# Altium PCB PCB1.PcbDoc (part 3 of 3)
Units mm, origin at the board's own origin, x right, y up, seen from the top; angles counter-clockwise.
Board outline 161.54 x 169.48 mm, 4 copper layers (Top Layer, Layer 1, Layer 2, Bottom Layer), stack 0.603 mm thick; 181 components, 244 nets, 1695 pads, 188 vias.
Unrouted connection lines stored in the file: 630.
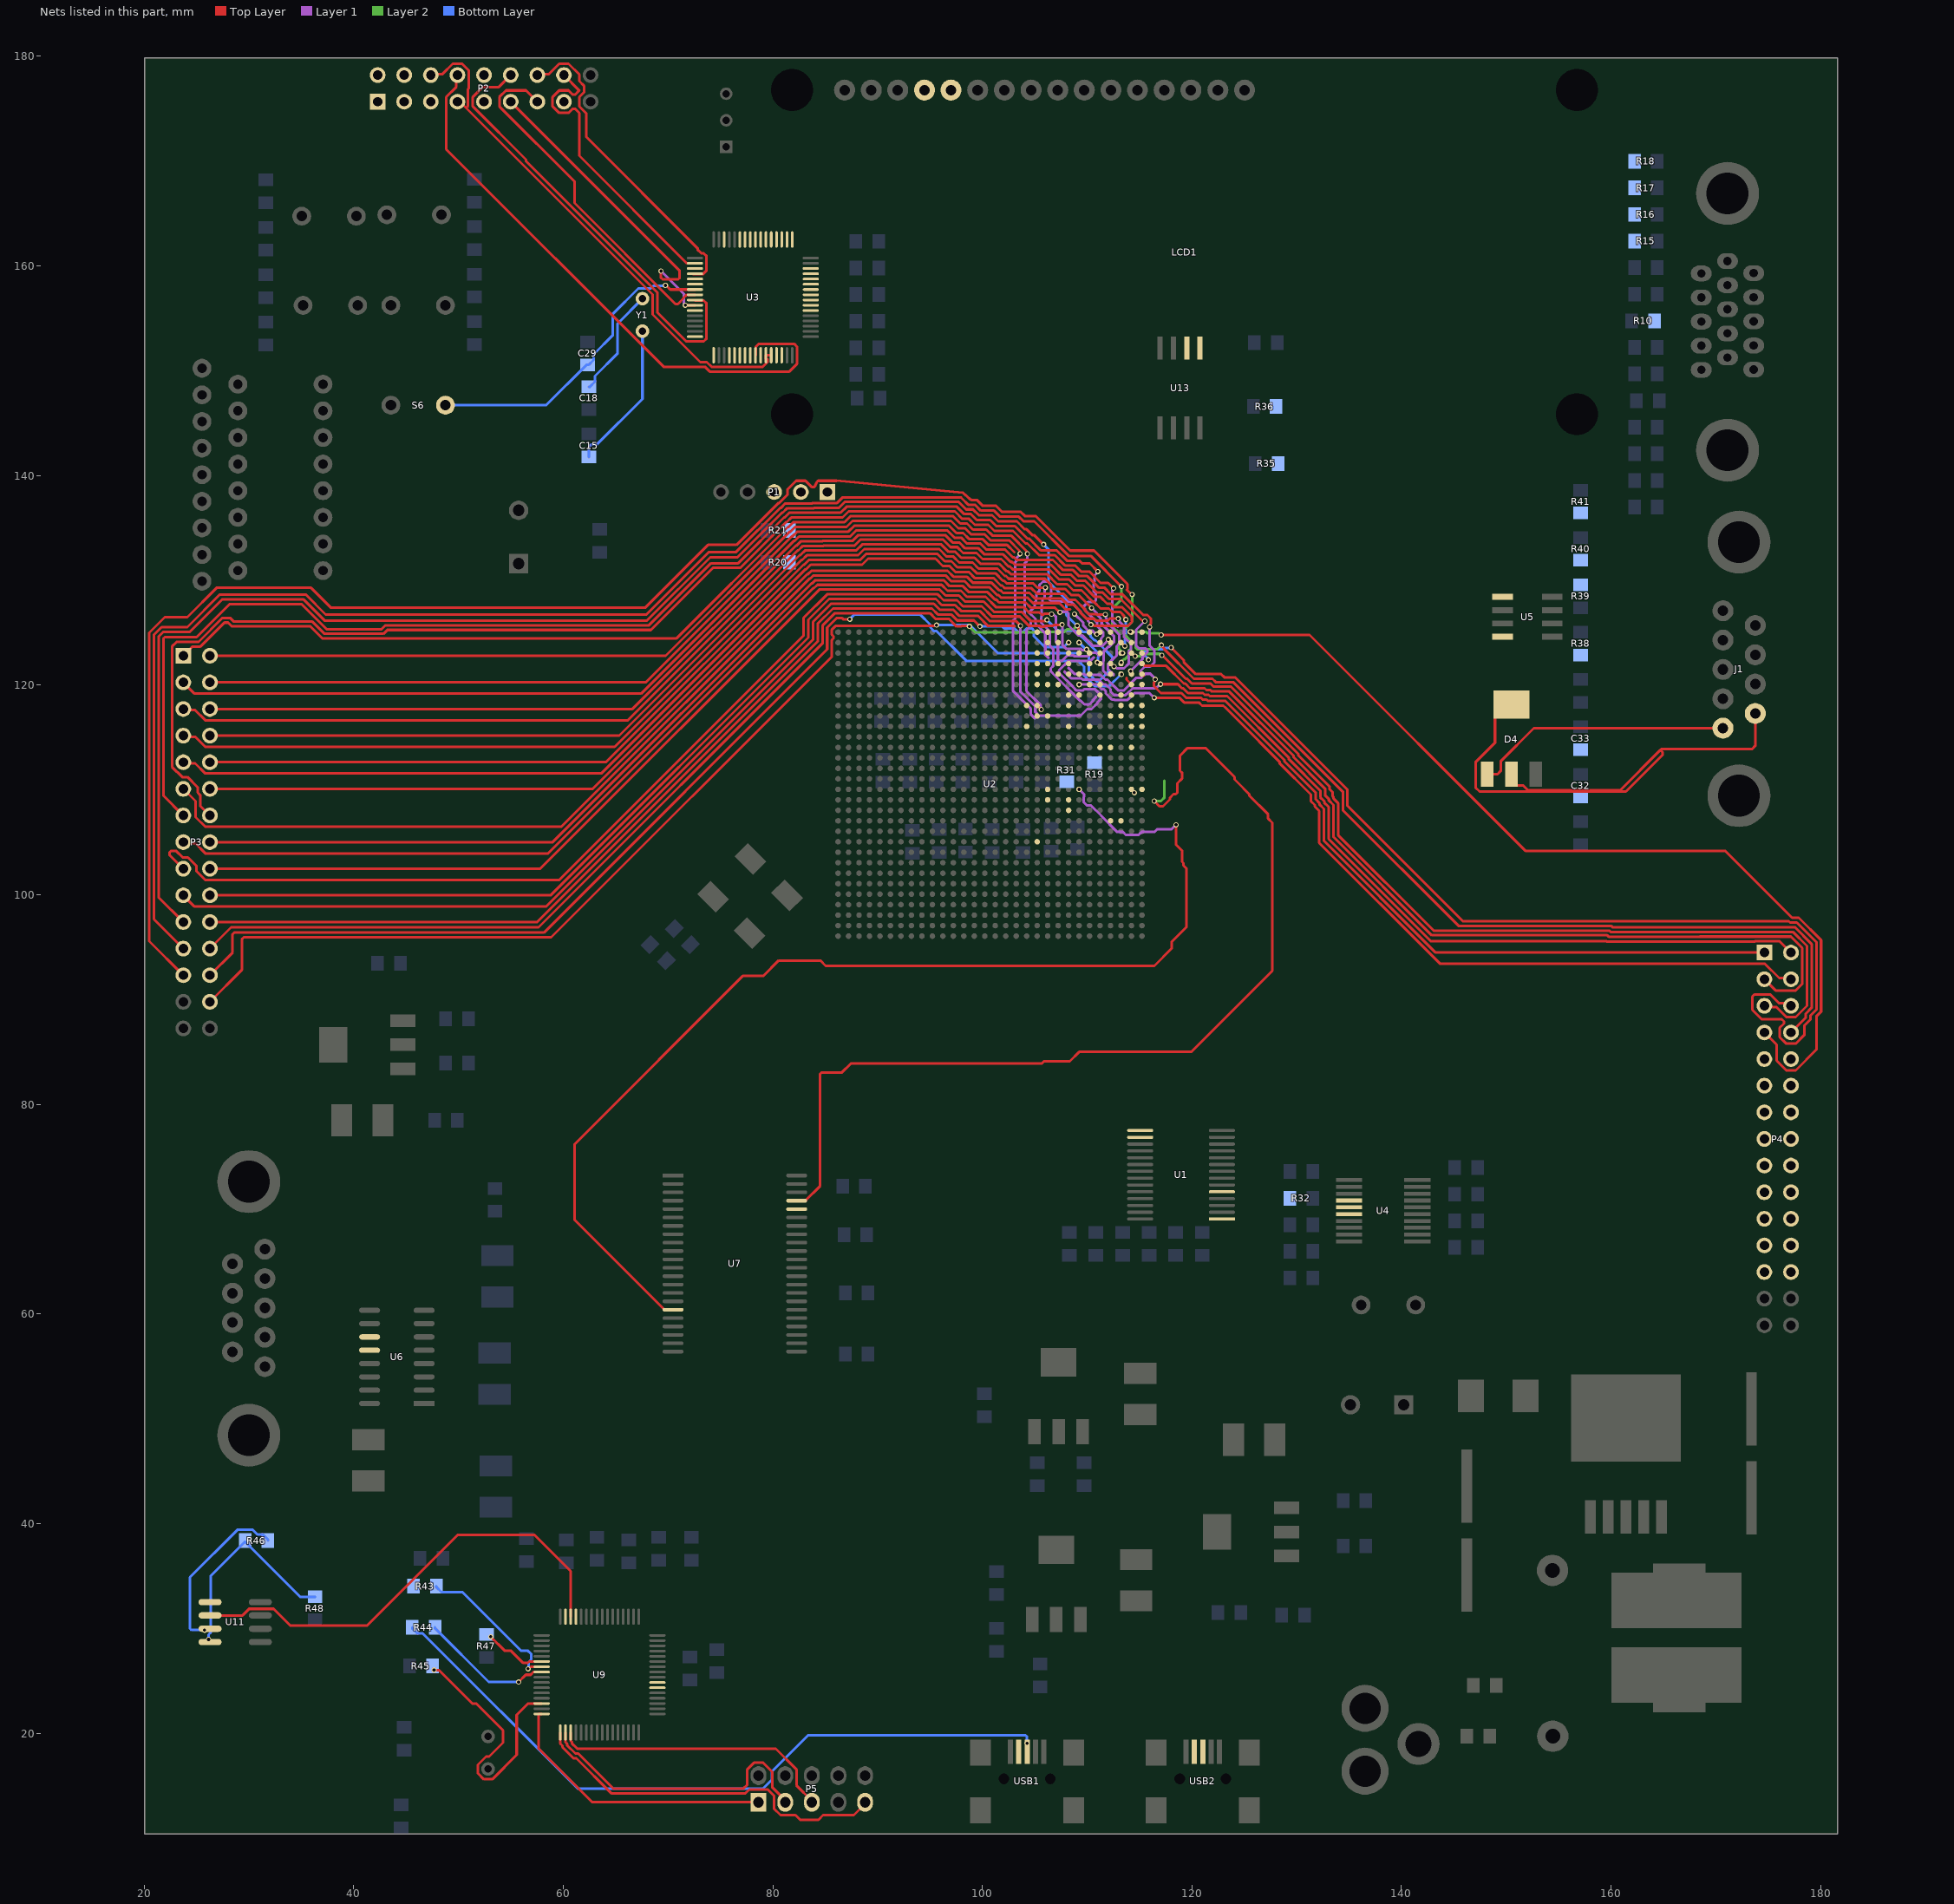
[diagram p5: the nets of this part, all layers, seen from the top]

## Via types
v1: diameter 0.5, hole 0.3, Top Layer to Bottom Layer, 94 vias
v2: diameter 0.5, hole 0.3, Top Layer to Layer 2, 55 vias
v3: diameter 0.5, hole 0.3, Top Layer to Layer 1, 39 vias

## Nets (pads, with @x,y where several pads share a name; then routed paths per layer and width w, separated by ;. In a path a pad name is that pad's centre, name@x,y a point inside that pad or via, vN(x,y) a via of type N, cw(c..) or ccw(c..) an arc to the next point about the centre after c; other vN are vias at no path point) (continued)
NetR43_1: R43.1 U9.7 | length 14.7
  Top Layer w0.25: v1(56.655,26.156) 56.723,26.156 56.913,26.346 U9.7@57.947,26.346
  Bottom Layer w0.25: R43.1@47.904,34.041 47.904,33.941 48.379,33.466 50.391,33.466 55.96,27.897 56.609,27.897 56.963,27.543 56.963,27.037 56.703,26.777 56.703,26.204 v1(56.655,26.156)
NetR43_2: R43.2 USB1.2
NetR44_1: R44.1 U9.8 | length 12.8
  Top Layer w0.25: v1(55.753,24.892) 56.442,25.581 56.893,25.581 57.158,25.846 U9.8@57.947,25.846
  Bottom Layer w0.25: R44.1@47.777,30.104 47.777,30.004 52.889,24.892 v1(55.753,24.892)
NetR44_2: R44.2 USB1.3 | length 68.3
  Bottom Layer w0.25: R44.2@45.593,30.104 45.593,30.004 46.068,29.529 46.593,29.529 61.389,14.733 79.091,14.733 79.916,15.557 79.916,16.358 83.37,19.812 104.121,19.812 104.267,19.666 v1(104.267,19.05)
NetR45_1: R45.1 U9.14 | length 25.8
  Top Layer w0.25: v1(47.683,26.035) 48.133,26.035 51.322,22.846 51.691,22.846 54.257,20.28 54.257,19.099 52.94,17.783 52.646,17.783 51.857,16.994 51.857,16.186 52.428,15.615 53.236,15.615 55.565,17.944 55.565,21.75 56.661,22.846 U9.14@57.947,22.846
NetR46_1: R46.1 U9.61 U11.3 | length 16.2
  Bottom Layer w0.25: v1(25.781,29.845) 24.53,29.845 24.384,29.991 24.384,34.886 28.907,39.409 30.376,39.409 30.826,38.959 31.351,38.959 31.826,38.484 R46.1@31.826,38.384
NetR46_2: R46.2 R48.1 U11.4 | length 19.6
  Bottom Layer w0.25: v1(26.162,28.956) 26.162,29.413 26.356,29.607 26.356,34.998 29.642,38.284 34.901,33.025 R48.1@36.322,33.025
NetR47_1: R47.1 U9.6 | length 5.9
  Top Layer w0.25: v1(53.086,29.21) 54.4,27.896 54.984,27.896 56.15,26.73 56.626,26.73 56.742,26.846 U9.6@57.947,26.846
NetU1_15: U1.15 USB2.3
NetU1_16: U1.16 USB2.2
NetU9_62: U9.62 U11.2 | length 44.7
  Top Layer w0.25: U11.2@26.302,31.247 29.4,31.247 30.025,31.872 32.373,31.872 33.958,30.286 41.288,30.286 49.931,38.929 57.261,38.929 60.722,35.468 U9.62@60.722,31.121
NetU9_63: U9.63 U11.1
NRST: C29.2 P1.3 R31.2 S6.2 U3.7 | length 30.2
  Top Layer w0.25: v1(69.759,158.146) 69.827,158.146 70.219,157.754 U3.7@72.58,157.754
  Bottom Layer w0.25: S6.2@48.768,146.717 58.387,146.717 62.232,150.562 C29.2@62.332,150.562 62.432,150.562 62.907,151.037 62.907,151.562 64.748,153.403 64.748,155.44 67.169,157.861 68.371,157.861 68.61,158.1 69.713,158.1 v1(69.759,158.146)
OE: U2.AJ15 U7.41 | length 97.3
  Top Layer w0.25: U7.41@82.285,70.814 83.11,70.814 84.524,72.228 84.524,82.912 84.67,83.058 86.607,83.058 87.46,83.911 105.689,83.911 105.885,84.107 108.341,84.107 109.241,85.007 119.932,85.007 127.671,92.746 127.671,106.88 127.274,107.277 127.274,107.674 125.469,109.478 125.469,109.603 124.311,110.76 124.311,110.763 124.068,111.006 124.068,111.233 121.299,114.002 119.593,114.002 118.865,113.274 118.865,111.837 119.047,111.655 119.047,111.084 118.607,110.644 118.607,109.747 118.461,109.601 118.244,109.601 117.925,109.282 117.925,109.222 117.907,109.204 117.907,109.111 117.247,108.451 116.898,108.451 v2(116.408,108.941) ; U2.AJ15@114.233,110.062 114.233,110.033 114.501,109.765 v2(114.501,109.736)
  Layer 2 w0.25: v2(116.408,108.941) 117.038,108.941 117.384,109.288 117.384,110.846 117.348,110.882
OSC_IN: C15.2 U3.5 Y1.2 | length 14.4
  Bottom Layer w0.25: C15.2@62.459,141.78 62.459,142.723 62.712,142.976 63.23,142.976 67.564,147.31 Y1.2@67.564,153.777
OSC_OUT: C18.1 U3.6 Y1.1 | length 10.6
  Bottom Layer w0.25: C18.1@62.459,148.482 62.559,148.482 63.034,148.957 63.034,149.504 65.198,151.669 65.198,154.511 Y1.1@67.564,156.877
P1: P2.1 U3.45
P2: P2.5 P2.6 P2.7 R19.1 U3.26 U3.27 U3.28 | length 50.7
  Top Layer w0.25: P2.6@47.371,178.213 47.476,178.318 48.496,178.318 49.466,179.288 50.356,179.288 50.986,178.658 50.986,176.926 50.926,176.866 50.926,175.259 50.743,175.076 ; P2.7@49.911,175.673 50.147,175.673 50.743,175.076 ; U3.28@79.855,151.479 U3.27@79.355,151.479 79.355,151.13 79.502,151.13 79.502,150.839 79.041,150.379 74.169,150.379 73.719,150.829 73.082,150.829 68.539,155.372 68.539,157.281 50.743,175.076
P5: P2.4 U3.29
P6: P2.3 U3.30
P7: P2.13 U3.8 | length 33.3
  Top Layer w0.25: P2.13@57.531,175.673 56.456,176.748 54.546,176.748 53.916,176.118 53.916,175.227 61.086,168.057 61.086,166.006 70.72,156.372 70.951,156.372 71.48,156.901 71.48,156.94 71.794,157.254 U3.8@72.58,157.254
P8: P2.12 U3.9 | length 42.9
  Top Layer w0.25: P2.12@54.991,178.213 53.824,177.046 52.304,177.046 51.376,176.118 51.376,175.227 56.456,170.147 56.456,170 68.989,157.467 68.989,155.558 71.744,152.804 73.416,152.804 73.68,153.067 73.68,156.44 73.416,156.704 U3.9@72.58,156.704
P9: P2.11 U3.10 | length 31.2
  Top Layer w0.25: P2.11@54.991,175.673 71.12,159.544 71.12,158.868 70.974,158.721 69.488,158.721 69.342,158.868 v3(69.342,159.512) ; v3(71.646,156.254) U3.10@72.58,156.254
  Layer 1 w0.25: v3(69.342,159.512) 71.501,157.353 71.501,156.399 v3(71.646,156.254)
P10: P2.10 U3.11
P11: P2.9 U3.24
P12: P2.8 U3.25 | length 56.7
  Top Layer w0.25: P2.8@49.911,178.213 49.806,178.107 49.806,177.088 48.836,176.118 48.836,171.126 69.583,150.379 73.532,150.379 73.982,149.929 81.591,149.929 82.305,150.642 82.305,152.315 82.041,152.579 78.669,152.579 78.405,152.315 U3.25@78.405,151.479
P13: P2.2 U3.40
P14: P2.16 U3.2 | length 28.6
  Top Layer w0.25: P2.16@60.071,178.213 61.533,176.751 61.126,176.345 60.919,176.345 60.516,176.748 59.626,176.748 58.996,176.118 58.996,175.227 59.626,174.598 60.516,174.598 60.919,175.001 61.126,175.001 61.536,174.591 61.536,170.511 71.794,160.254 U3.2@72.58,160.254
P15: P2.15 U3.3
P16: P2.14 U3.4 | length 30.5
  Top Layer w0.25: P2.14@57.531,178.213 57.636,178.318 58.656,178.318 59.626,179.288 60.516,179.288 61.536,178.268 61.536,177.64 61.983,177.193 61.983,176.565 61.536,176.118 61.536,175.227 62.221,174.542 62.221,172.303 72.831,161.694 72.831,161.56 73.168,161.223 73.302,161.223 73.307,161.217 73.403,161.217 73.68,160.94 73.68,159.567 73.316,159.204 U3.4@72.39,159.204
PA2: U2.AG22 U3.16
PA3: U2.AD24 U3.17
PA4: U2.AC24 U3.20
PA5: U2.AH22 U3.21
PA6: U2.AH23 U3.22
PA7: U2.AH24 U3.23
PA8: U2.AJ23 U3.41
PA11: U2.AJ24 U3.44
PB50: U2.AE21 U2.W23 U3.50
PB55: U2.AJ21 U3.57
PB56: U2.AK21 U3.56
PB57: U2.AK22 U3.55
PC51: U2.AJ25 U3.53 | length 0.8
  Top Layer w0.25: 113.763,120.697 113.763,120.532 U2.AJ25@114.233,120.062
PC52: U2.AK25 U3.52
PC53: U2.AC21 U3.51
PD54: U2.AK23 U3.54
PP20: P3.2 U2.Y22 | length 100.9
  Top Layer w0.25: P3.2@26.289,122.809 69.781,122.809 81.627,134.655 81.701,134.655 82.14,135.095 84.445,135.095 ccw(c82.677,138.43) 84.464,135.105 87.034,135.105 87.609,135.68 97.011,135.68 97.718,134.973 98.354,134.973 98.92,134.407 100.189,134.407 100.766,133.83 102.548,133.83 103.55,132.828 103.55,132.595 v1(103.598,132.547)
  Layer 1 w0.25: v1(103.598,132.547) 103.598,132.479 103.238,132.119 103.238,131.847 103.145,131.754 103.145,126.365 102.912,126.131 102.912,119.465 104.606,117.771 104.606,117.251 105.023,116.834
PP21: P3.1 U2.Y23 | length 105.5
  Top Layer w0.25: P3.1@23.749,122.809 24.627,123.687 25.392,123.687 27.678,125.973 28.027,125.973 28.389,125.611 35.881,125.611 37.043,124.449 70.785,124.449 81.441,135.105 81.514,135.105 81.954,135.545 84.33,135.545 ccw(c82.677,138.43) 84.347,135.555 86.847,135.555 87.422,136.13 97.197,136.13 97.904,135.423 98.54,135.423 99.106,134.857 100.375,134.857 100.952,134.28 102.734,134.28 104.25,132.764 104.25,132.575 v1(104.298,132.527) ; U2.Y23@105.233,118.062 105.239,118.062 105.625,117.676 v1(105.631,117.676)
  Layer 1 w0.25: v1(104.298,132.527) 104.298,131.891 104.182,131.775 104.182,131.773 104.023,131.615 104.023,126.733 104.624,126.131 104.624,125.655 104.209,125.24 104.209,119.441 105.377,118.273 105.583,118.066 105.583,117.724 v1(105.631,117.676)
PP22: P3.4 U2.W21 | length 84
  Top Layer w0.25: P3.4@26.289,120.269 67.878,120.269 81.814,134.205 81.887,134.205 82.327,134.645 84.554,134.645 ccw(c82.677,138.43) 84.574,134.655 87.22,134.655 87.795,135.23 96.824,135.23 97.531,134.523 98.168,134.523 98.734,133.957 100.002,133.957 100.579,133.38 102.362,133.38 103.043,132.698
PP24: P3.3 U2.AK26 | length 109.1
  Top Layer w0.25: P3.3@23.749,120.269 24.824,119.194 67.439,119.194 82,133.755 82.073,133.755 82.513,134.195 84.657,134.195 ccw(c82.677,138.43) 84.678,134.205 87.406,134.205 87.981,134.78 96.638,134.78 97.345,134.073 97.981,134.073 98.547,133.507 99.816,133.507 100.393,132.93 102.175,132.93 102.889,132.216 103.005,132.216 103.269,131.952 106.726,131.952 107.694,130.984 108.65,130.984 109.232,130.402 110.019,130.402 111.106,129.315 111.64,129.315 112.284,128.671 113.375,128.671 115.357,126.688 115.748,126.688 116.085,126.351 116.085,125.875 116.008,125.798 116.008,125.598 v1(115.96,125.55) ; U2.AK26@115.233,121.062 115.233,121.044 U2.AK26@115.373,120.904
  Layer 1 w0.25: 115.089,121.258 115.089,121.352 115.513,121.775 116.022,121.775 116.427,122.181 116.427,123.307 115.96,123.774 v1(115.96,125.55)
PP26: P3.6 U2.AJ26 | length 106.4
  Top Layer w0.25: P3.6@26.289,117.729 66.611,117.729 82.187,133.305 82.26,133.305 82.7,133.745 84.754,133.745 ccw(c82.677,138.43) 84.777,133.755 87.593,133.755 88.168,134.33 96.451,134.33 97.158,133.623 97.795,133.623 98.361,133.057 99.629,133.057 100.206,132.48 101.989,132.48 102.703,131.766 102.819,131.766 103.083,131.502 106.539,131.502 107.507,130.534 108.464,130.534 109.046,129.952 109.832,129.952 110.919,128.865 111.453,128.865 112.097,128.221 113.188,128.221 115.248,126.161 115.462,126.161 v1(115.51,126.113) ; v1(114.152,121.352) 114.179,121.324 114.179,121.116 U2.AJ26@114.233,121.062
  Layer 1 w0.25: v1@114.152,121.406 114.206,121.406 115.277,122.478 115.277,122.657 115.755,123.135 115.755,123.342 115.594,123.504 114.954,123.504 114.681,123.777 114.681,125.284 v1(115.51,126.113)
PP27: P3.5 U2.AC28 | length 121.8
  Top Layer w0.25: P3.5@23.749,117.729 23.854,117.624 24.874,117.624 25.844,116.654 66.172,116.654 82.373,132.855 82.446,132.855 82.886,133.295 84.847,133.295 ccw(c82.677,138.43) 84.871,133.305 87.779,133.305 88.354,133.88 96.265,133.88 96.972,133.173 97.608,133.173 98.174,132.607 99.443,132.607 100.02,132.03 101.802,132.03 102.516,131.316 102.633,131.316 102.897,131.052 106.353,131.052 107.321,130.084 108.277,130.084 108.859,129.502 109.646,129.502 110.733,128.415 111.267,128.415 111.911,127.771 112.255,127.771 112.598,127.428 113.345,127.428 114.271,126.502 114.271,126.025 113.898,125.652 113.477,125.652 110.721,125.652 110.65,125.723 110.411,125.723 v1(110.363,125.771)
  Layer 1 w0.25: 106.308,122.611 106.008,122.911 106.008,124.931 105.074,125.865 105.074,126.318 104.484,126.908 104.484,126.959 104.976,127.45 104.976,127.865 105.131,128.02 105.131,128.265 105.161,128.295 105.161,128.715 105.435,128.989 105.435,129.165 105.435,129.547 105.772,129.884 106.248,129.884 106.585,129.547 106.585,129.165 106.585,128.513 106.422,128.35 106.422,128.143 106.569,127.996 108.402,127.996 109.364,127.035 109.364,126.947 110.091,126.22 110.091,126.111 110.363,125.838 v1(110.363,125.771)
PP28: P3.8 U2.AH29 | length 100.8
  Top Layer w0.25: P3.8@26.289,115.189 65.343,115.189 82.559,132.405 82.633,132.405 83.072,132.845 84.937,132.845 ccw(c82.677,138.43) 84.962,132.855 87.966,132.855 88.541,133.43 96.079,133.43 96.786,132.723 97.422,132.723 97.988,132.157 99.257,132.157 99.834,131.58 101.616,131.58 102.33,130.866 102.446,130.866 102.71,130.602 106.167,130.602 107.135,129.634 108.091,129.634 108.673,129.052 109.46,129.052 110.546,127.965 110.642,127.965 111.287,127.321 112.068,127.321 112.411,126.978 113.159,126.978 113.538,126.599 113.538,126.49 ; U2.AH29@113.233,124.062 113.25,124.062 113.583,123.728 v1(113.6,123.728)
  Bottom Layer w0.25: v1(113.6,123.728) 113.6,124.395 113.696,124.491 v1(113.696,126.263)
PP29: P3.7 U2.AE25 | length 105.5
  Top Layer w0.25: P3.7@23.749,115.189 23.854,115.084 24.874,115.084 25.844,114.114 64.905,114.114 82.746,131.955 82.819,131.955 83.259,132.395 85.023,132.395 ccw(c82.677,138.43) 85.049,132.405 88.152,132.405 88.727,132.98 95.892,132.98 96.599,132.273 97.236,132.273 97.802,131.707 99.07,131.707 99.647,131.13 101.43,131.13 102.144,130.416 102.26,130.416 102.524,130.152 105.98,130.152 106.585,129.547 106.585,129.331 106.731,129.184 107.904,129.184 108.487,128.602 109.192,128.602 v1(110.424,127.371) ; U2.AE25@110.109,120.015 110.186,120.015 U2.AE25@110.233,120.062
  Layer 1 w0.25: v1(110.424,127.371) 110.894,126.9 110.894,126.78 111.303,126.372 111.303,126.281 111.388,126.195 111.388,125.849 112.586,124.651 112.586,124.136 112.142,123.692 112.05,123.692 111.562,123.204 111.562,122.293 111.546,122.278 111.546,121.367 111.931,120.982
PP31: P3.10 U2.AF25 | length 104
  Top Layer w0.25: P3.10@26.289,112.649 64.076,112.649 82.932,131.505 83.005,131.505 83.445,131.945 85.106,131.945 ccw(c82.677,138.43) 85.133,131.955 88.338,131.955 88.913,132.53 95.706,132.53 96.413,131.823 97.049,131.823 97.615,131.257 98.884,131.257 99.461,130.68 101.243,130.68 101.957,129.966 102.073,129.966 102.337,129.702 104.872,129.702 105.265,129.309 v1(106.01,129.309)
  Layer 1 w0.25: v1(106.01,129.309) 105.962,129.261 105.962,128.403 105.736,128.177 105.736,127.703 105.658,127.625 105.658,126.526 105.597,126.465 105.597,125.989 105.658,125.928 105.658,125.917 106.458,125.117 106.458,123.751 106.758,123.451 106.758,121.823 106.534,121.599 106.534,121.329 106.685,121.177 106.685,121.16 109.358,118.487 109.427,118.487 109.744,118.17 110.22,118.17 110.557,118.507 110.557,118.573 110.814,118.83 110.814,118.917
PP33: P3.9 U2.AG26 | length 106.2
  Top Layer w0.25: P3.9@23.749,112.649 23.854,112.544 24.874,112.544 25.844,111.574 63.637,111.574 83.119,131.055 83.192,131.055 83.632,131.495 85.186,131.495 ccw(c82.677,138.43) 85.214,131.505 88.525,131.505 89.1,132.08 95.519,132.08 95.593,132.007 96.226,131.373 96.863,131.373 97.429,130.807 98.697,130.807 99.274,130.23 101.057,130.23 101.771,129.516 101.887,129.516 102.151,129.252 104.686,129.252 105.204,128.734 107.718,128.734 108.3,128.152 108.883,128.152 109.814,127.221 109.814,127.106 110.124,126.796 110.85,126.796 110.9,126.746 v1(111.742,126.746)
  Layer 1 w0.25: v1(111.742,126.746) 111.789,126.698 111.789,126.431 111.878,126.342 111.878,125.996 113.081,124.793 113.081,123.994 112.808,123.721 112.808,122.824 112.471,122.487 112.454,122.487 111.996,122.029 111.996,121.553 112.541,121.009 112.541,120.954
PP34: P3.12 U2.AG27 | length 104.4
  Top Layer w0.25: P3.12@26.289,110.109 62.809,110.109 83.305,130.605 83.378,130.605 83.696,130.923 96.676,130.923 97.242,130.357 98.511,130.357 99.088,129.78 100.87,129.78 101.584,129.066 101.701,129.066 101.965,128.802 104.499,128.802 105.017,128.284 107.532,128.284 108.114,127.702 108.696,127.702 109.364,127.035 109.364,126.919 109.937,126.346 110.664,126.346 110.838,126.171 111.98,126.171 112.169,126.361 v1(112.963,126.361) ; U2.AG27@112.233,122.062 112.267,122.062 112.538,121.791 v1(112.571,121.791)
  Layer 1 w0.25: v1(112.571,121.791) 112.639,121.791 112.824,121.606 113.522,121.606 113.958,122.042 113.958,123.194 114.175,123.411 114.175,123.968 113.838,124.305 113.82,124.305 113.531,124.594 113.531,125.616 113.306,125.841 113.121,126.025 113.121,126.134 112.963,126.293 v1(112.963,126.361)
PP35: P3.11 U2.AF30 | length 101.8
  Top Layer w0.25: P3.11@23.749,110.109 24.916,108.942 24.916,107.422 25.844,106.494 59.83,106.494 83.491,130.155 83.565,130.155 83.883,130.473 96.49,130.473 97.056,129.907 98.325,129.907 98.902,129.33 100.684,129.33 101.398,128.616 101.514,128.616 101.778,128.352 104.313,128.352 104.831,127.834 107.345,127.834 107.927,127.252 108.405,127.252 ; v1(110.921,124.867) 110.979,124.867 111.174,125.062 U2.AF30@111.233,125.062
  Layer 1 w0.25: v1(108.789,126.796) 109.641,125.944 109.641,125.68 110.125,125.196 110.524,125.196 110.853,124.867 v1(110.921,124.867)
PP36: P3.14 U2.AG30 | length 121.4
  Top Layer w0.25: P3.14@26.289,107.569 25.366,108.492 25.366,109.512 25.122,109.756 25.122,110.256 24.148,111.23 23.648,111.23 22.674,112.204 22.674,123.694 23.117,124.137 25.205,124.137 27.491,126.423 28.213,126.423 28.576,126.061 36.067,126.061 37.229,124.899 42.858,124.899 43.228,125.269 68.377,125.269 74.296,131.188 76.888,131.188 81.255,135.555 81.328,135.555 81.768,135.995 84.205,135.995 ccw(c82.677,138.43) 84.221,136.005 86.661,136.005 87.236,136.58 97.383,136.58 98.09,135.873 98.727,135.873 99.293,135.307 100.561,135.307 101.138,134.73 102.921,134.73 104.121,133.529 104.292,133.529 105.42,132.402 106.912,132.402 107.88,131.434 108.836,131.434 109.419,130.852 110.205,130.852 111.292,129.765 112.003,129.765 v1(112.522,129.246)
  Layer 1 w0.25: v1(112.522,129.246) 112.522,129.178 112.395,129.051 112.395,126.608 112.388,126.601 112.388,126.122 112.94,125.57
PP37: P3.13 U2.AF29 | length 125.1
  Top Layer w0.25: P3.13@23.749,107.569 21.844,109.474 21.844,124.441 21.99,124.587 25.019,124.587 28.183,127.751 35.013,127.751 37.415,125.349 42.672,125.349 43.042,125.719 68.191,125.719 74.11,131.638 76.701,131.638 81.068,136.005 81.141,136.005 81.581,136.445 84.07,136.445 ccw(c82.677,138.43) 84.084,136.455 86.474,136.455 87.049,137.03 97.57,137.03 98.277,136.323 98.913,136.323 99.479,135.757 100.748,135.757 101.325,135.18 103.107,135.18 104.308,133.979 104.479,133.979 105.606,132.852 107.099,132.852 108.067,131.884 109.244,131.884 109.516,131.612 110.258,131.612 v1(111.024,130.846)
  Layer 1 w0.25: v1(111.024,130.846) 111.024,130.779 110.705,130.46 110.705,129.866 110.617,129.778 110.617,128.935 110.832,128.72 110.832,128.092 110.686,127.946 110.101,127.946 109.698,127.543 109.698,127.336 109.814,127.221 109.814,127.134 110.938,126.009 110.938,125.663 111.517,125.084 111.517,124.681 111.496,124.66 111.496,124.629 111.338,124.471 111.338,124.253 111.304,124.219
PP39: P3.16 U2.AG29 | length 99.7
  Top Layer w0.25: P3.16@26.289,105.029 59.002,105.029 83.678,129.705 83.751,129.705 84.069,130.023 96.304,130.023 96.87,129.457 98.138,129.457 98.715,128.88 100.498,128.88 101.212,128.166 101.328,128.166 101.592,127.902 104.127,127.902 104.644,127.384 106.942,127.384 107.364,126.962 v1(107.404,126.962)
  Layer 1 w0.25: v1(107.404,126.962) 107.45,127.008 108.067,127.008 108.214,126.861 108.214,125.706 109.182,124.738 109.559,124.738 110.528,123.769 111.491,123.769 111.788,124.067 111.788,124.083 112.011,124.306 v1(112.011,124.374)
PP40: P3.15 U2.AE27 | length 104.3
  Top Layer w0.25: P3.15@23.749,105.029 23.854,104.924 24.874,104.924 25.844,103.954 58.563,103.954 83.864,129.255 83.937,129.255 84.255,129.573 96.117,129.573 96.683,129.007 97.952,129.007 98.529,128.43 100.311,128.43 101.289,127.452 103.94,127.452 104.458,126.934 105.458,126.934 105.648,126.744 105.856,126.744 105.914,126.802 106.58,126.802 v1(106.606,126.776)
  Layer 1 w0.25: v1(106.606,126.776) 106.777,126.776 107.035,126.518 107.035,124.103 107.208,123.931 107.208,122.44 107.354,122.294 107.562,122.294 108.132,122.864 108.657,122.864 108.741,122.78 110.127,122.78 110.456,123.108 110.829,123.108 111.092,122.845 111.112,122.825
PP42: P3.18 U2.AF27 | length 99.8
  Top Layer w0.25: P3.18@26.289,102.489 57.808,102.489 84.442,129.123 95.931,129.123 96.497,128.557 97.765,128.557 98.342,127.98 100.125,127.98 101.103,127.002 103.754,127.002 104.654,126.102 105.979,126.102 106.104,126.227 v1(106.172,126.227) ; v1(110.971,122.174) 111.019,122.126 111.093,122.126 111.157,122.062 U2.AF27@111.233,122.062
  Bottom Layer w0.25: v1(106.172,126.227) 107.197,125.202 108.858,125.202 109.423,124.637 109.471,124.637 111.239,122.869 111.019,122.649 111.019,122.222 v1(110.971,122.174)
PP43: P3.17 U2.AE28 | length 106.9
  Top Layer w0.25: P3.17@23.749,102.489 22.421,103.817 22.421,104.024 22.567,104.171 23.087,104.171 23.694,103.564 24.194,103.564 25.019,102.739 25.019,102.239 25.844,101.414 59.627,101.414 82.943,124.73 82.943,126.425 85.191,128.673 95.744,128.673 96.31,128.107 97.579,128.107 98.156,127.53 99.938,127.53 100.916,126.552 103.567,126.552 104.467,125.652 105.477,125.652 105.547,125.583 105.919,125.583 105.989,125.652 106.724,125.652 106.801,125.729 107.562,125.729 v1(107.61,125.777)
  Layer 1 w0.25: v1(107.61,125.777) 107.658,125.729 107.658,123.824 107.995,123.487 109.379,123.487 109.504,123.362 109.897,123.362 v3(109.943,123.408)
PP44: P3.20 U2.AF28 | length 116.5
  Top Layer w0.25: P3.20@26.289,99.949 58.798,99.949 83.393,124.544 83.393,126.238 85.378,128.223 95.558,128.223 96.124,127.657 97.393,127.657 97.97,127.08 99.752,127.08 100.73,126.102 103.236,126.102 103.647,125.691 v1(103.647,125.659)
  Layer 1 w0.25: v1(103.647,125.659) 103.647,119.366 105.056,117.957 105.056,117.438 105.393,117.101 109.384,117.101 110.003,117.72 110.407,117.72 111.007,118.32 111.007,118.386 111.308,118.688 111.308,119.059 110.73,119.637 109.734,119.637 109.584,119.487 108.995,119.487 108.658,119.824 108.658,119.841 107.315,121.183 107.315,121.411 108.234,122.33 110.314,122.33 110.642,122.658
PP48: P3.19 U2.AE26 | length 93.6
  Top Layer w0.25: P3.19@23.749,99.949 24.824,98.874 58.36,98.874 83.843,124.357 83.843,126.052 85.564,127.773 95.372,127.773 95.938,127.207 97.206,127.207 97.783,126.63 99.566,126.63 100.544,125.652 103.05,125.652 103.072,125.63
PP50: P3.22 U2.AC29 | length 97.6
  Top Layer w0.25: P3.22@26.289,97.409 57.531,97.409 84.293,124.171 84.293,125.866 85.75,127.323 95.185,127.323 95.751,126.757 97.02,126.757 97.597,126.18 99.193,126.18 v1(99.768,125.605)
  Bottom Layer w0.25: v1(99.768,125.605) 101.918,125.605 102.121,125.402 103.091,125.402 103.409,125.084 103.886,125.084 104.204,125.402 104.756,125.402 104.902,125.256 104.902,124.714 105.977,123.639 107.772,123.639 108.195,124.062 v1(108.233,124.062)
PP51: P3.21 U2.AD29 | length 142.6
  Top Layer w0.25: P3.21@23.749,97.409 21.394,99.764 21.394,124.627 21.862,125.095 24.384,125.095 27.49,128.201 35.2,128.201 37.232,126.169 68.004,126.169 74.042,132.207 76.634,132.207 80.882,136.455 80.955,136.455 81.395,136.895 83.92,136.895 ccw(c82.677,138.43) 83.932,136.905 86.288,136.905 86.863,137.48 97.756,137.48 98.463,136.773 99.099,136.773 99.665,136.207 100.934,136.207 101.511,135.63 103.294,135.63 104.05,134.874 104.22,134.874 104.797,134.298 104.978,134.298 v1(105.849,133.427)
  Bottom Layer w0.25: v1(105.849,133.427) 106.299,132.977 106.299,129.88 108.01,128.169 108.01,126.686 109.609,125.087 109.99,125.087 110.346,124.731 110.346,124.629 110.683,124.292 110.785,124.292 112.418,122.659 112.418,122.451 111.996,122.029 111.996,121.553 112.035,121.514 112.036,121.307 111.102,120.373 110.894,120.373 110.167,121.1 110.167,123.128 v1(109.233,124.062)
PP52: P3.24 U2.AD30 | length 98.8
  Top Layer w0.25: P3.24@26.289,94.869 28.321,96.901 57.659,96.901 84.743,123.985 84.743,124.306 84.743,125.679 85.937,126.873 94.999,126.873 95.565,126.307 96.833,126.307 97.535,125.605 97.942,125.605 97.989,125.652 98.721,125.652 v2(98.768,125.605) ; v2(109.048,125.685) 109.048,125.617 109.179,125.485 109.179,125.116 U2.AD30@109.233,125.062
  Layer 2 w0.25: v2(98.768,125.605) 99.343,125.03 105.388,125.03 105.452,125.094 107.848,125.094 108.103,125.349 108.712,125.349 v2(109.048,125.685)
PP78: P3.28 U2.AD28 | length 102.3
  Top Layer w0.25: P3.28@26.289,89.789 29.337,92.837 29.337,95.758 29.521,95.942 58.858,95.942 85.643,122.727 85.643,123.612 85.643,124.306 85.795,124.458 85.795,124.666 85.643,124.818 85.643,125.306 85.989,125.653 95.554,125.653 v1(95.631,125.73)
  Bottom Layer w0.25: v1(95.631,125.73) 98.83,125.73 101.497,123.063 109.22,123.063
PP80: P3.25 U2.AH27 | length 148.3
  Top Layer w0.25: P3.25@23.749,92.329 20.494,95.584 20.494,125 21.986,126.492 24.13,126.492 26.924,129.286 35.941,129.286 37.846,127.381 67.818,127.381 73.823,133.386 76.54,133.386 80.509,137.355 80.582,137.355 81.407,138.18 81.407,138.68 82.232,139.505 83.122,139.505 83.658,138.97 ; 83.658,138.969 ccw(c83.834,139.147) 84.068,139.057 84.181,139.354 84.332,139.505 86.089,139.505 98.129,138.38 98.848,137.737 98.849,137.736 ccw(c99.015,137.923) 99.013,137.673 99.472,137.673 100.038,137.107 101.307,137.107 101.884,136.53 103.666,136.53 104.052,136.144 105.079,136.144 108.381,132.842 110.668,132.842 113.859,129.651 113.859,129.175 113.787,129.103 114.238,128.651 v2(114.3,128.651)
  Layer 2 w0.25: v2(113.252,122.181) 113.252,122.216 113.524,122.487 113.621,122.487 113.958,122.824 113.958,123.273 114.175,123.49 114.175,124.213 113.531,124.857 113.531,125.333 113.886,125.688 113.934,125.688 114.3,126.054 v2(114.3,128.651)
PP81: P3.26 U2.AH26 | length 107.5
  Top Layer w0.25: P3.26@26.289,92.329 28.449,94.489 28.449,96.246 28.595,96.392 58.165,96.392 85.193,123.42 85.193,123.798 85.193,124.493 85.193,125.493 86.123,126.423 86.598,126.423 86.723,126.298 v1(87.348,126.298)
  Bottom Layer w0.25: v1(87.348,126.298) 87.798,126.748 94.049,126.748 95.056,125.741 95.056,125.492 95.393,125.155 95.642,125.155 98.469,122.328 109.164,122.328 109.717,121.775 109.717,120.914 110.708,119.923 112.113,119.923 113.222,121.031 v1(113.284,121.031)
PP85: P3.23 U2.AH28 | length 141.2
  Top Layer w0.25: P3.23@23.749,94.869 20.944,97.674 20.944,124.813 21.676,125.545 24.13,125.545 27.236,128.651 35.433,128.651 37.338,126.746 67.691,126.746 67.714,126.723 67.922,126.723 73.914,132.715 76.505,132.715 80.695,136.905 80.769,136.905 81.209,137.345 83.748,137.345 ccw(c82.677,138.43) 83.759,137.355 86.102,137.355 86.677,137.93 97.942,137.93 98.081,137.791 98.649,137.223 99.286,137.223 99.852,136.657 101.12,136.657 101.697,136.08 103.48,136.08 103.93,135.63 104.957,135.63 108.253,132.334 110.349,132.334 113.27,129.413 v2(113.284,129.413)
  Layer 2 w0.25: v2(113.284,129.413) 113.284,128.182 112.388,127.286 112.388,125.622 113.081,124.929 113.081,124.024 113.025,123.968 113.025,123.488 113.383,123.13 v2(113.383,123.062)
PP86: P4.2 U2.AB27 | length 83.8
  Top Layer w0.25: v1(117.013,120.096) 118.661,120.096 119.051,119.706 119.177,119.706 119.627,119.256 121.032,119.256 121.209,119.079 121.583,119.079 121.71,118.952 123.372,118.952 129.261,113.063 129.261,112.934 132.252,109.943 132.252,109.306 132.621,108.937 132.621,108.81 133.049,108.382 133.049,105.334 142.82,95.563 159.576,95.563 159.588,95.551 173.728,95.551 173.74,95.563 176.09,95.563 P4.2@177.165,94.488
  Layer 1 w0.25: 107.838,121.297 108.498,120.637 109.471,120.637 109.571,120.537 111.103,120.537 111.558,120.082 111.764,120.082 112.233,119.613 112.233,119.399 112.57,119.062 112.784,119.062 112.808,119.037 113.658,119.037 113.754,119.134 113.776,119.134 114.345,119.703 116.552,119.703 116.945,120.096 v1(117.013,120.096)
PP87: P4.1 U2.AC27 | length 81.9
  Top Layer w0.25: v1(116.494,120.566) 116.446,120.518 116.446,120.342 116.387,120.283 116.387,119.909 117.04,119.256 118.99,119.256 119.44,118.806 120.846,118.806 121.023,118.629 121.396,118.629 121.523,118.502 123.186,118.502 128.811,112.877 128.811,112.747 131.802,109.756 131.802,109.12 132.171,108.751 132.171,108.624 132.599,108.196 132.599,105.148 143.259,94.488 P4.1@174.625,94.488
  Layer 1 w0.25: 108.203,121.663 108.779,121.087 109.658,121.087 109.758,120.987 111.289,120.987 111.745,120.532 111.95,120.532 112.995,119.487 113.471,119.487 114.692,120.708 115.176,120.708 115.558,121.089 116.034,121.089 116.494,120.629 v1(116.494,120.566)
PP90: P4.4 U2.AD25 | length 82.6
  Top Layer w0.25: v1(116.398,118.806) 118.804,118.806 119.254,118.356 120.659,118.356 120.963,118.052 122.997,118.052 123.212,117.837 123.215,117.837 124.394,116.657 128.361,112.691 128.361,112.561 131.352,109.57 131.352,108.934 131.721,108.564 131.721,108.437 132.149,108.009 132.149,104.961 143.697,93.413 174.68,93.413 176.04,92.053 177.06,92.053 P4.4@177.165,91.948
  Layer 1 w0.25: v1(109.233,120.062) 109.258,120.087 110.917,120.087 111.372,119.632 111.577,119.632 111.783,119.426 111.783,119.212 112.383,118.612 112.597,118.612 112.622,118.587 113.844,118.587 113.941,118.684 113.963,118.684 114.532,119.253 115.951,119.253 v1(116.398,118.806)
PP93: P4.3 U2.AK27 | length 84.3
  Top Layer w0.25: U2.AK27@115.233,122.062 115.309,122.062 115.527,121.844 117.55,121.844 119.238,120.156 119.363,120.156 119.813,119.706 121.219,119.706 121.396,119.529 121.769,119.529 121.896,119.402 123.559,119.402 129.711,113.25 129.711,113.12 132.702,110.129 132.702,109.493 133.071,109.124 133.071,108.997 133.499,108.569 133.499,105.521 142.881,96.139 159.636,96.139 159.774,96.001 168.461,96.001 168.473,96.013 177.16,96.013 178.24,94.933 178.24,91.503 177.61,90.873 175.7,90.873 P4.3@174.625,91.948
PP94: P4.6 U2.AK28 | length 100.7
  Top Layer w0.25: v1(118.015,123.591) 119.217,122.388 119.217,122.211 120.372,121.056 122.785,121.056 123.089,120.752 124.118,120.752 134.849,110.021 134.849,108.491 145.851,97.489 176.957,97.489 177.083,97.363 177.719,97.363 179.59,95.492 179.59,89.04 179.012,88.462 179.012,88.079 178.435,87.502 178.435,86.618 177.61,85.793 176.72,85.793 176.09,86.423 176.09,87.313 176.493,87.716 176.493,87.923 176.278,88.138 174.371,88.138 173.482,89.027 173.482,90.297 173.668,90.483 175.206,90.483 176.042,89.647 176.926,89.647 P4.6@177.165,89.408
  Bottom Layer w0.25: v1(115.852,122.419) 115.852,122.487 115.541,122.798 115.541,123.253 115.732,123.444 117.265,123.444 117.39,123.569 117.993,123.569 v1(118.015,123.591)
PP95: P4.5 U2.AJ28 | length 88.7
  Top Layer w0.25: v2(117.126,122.853) 117.177,122.853 119.424,120.606 119.55,120.606 120,120.156 121.778,120.156 122.082,119.852 123.745,119.852 130.161,113.436 130.161,113.306 133.152,110.316 133.152,110.053 133.441,109.764 133.441,109.383 133.521,109.303 133.521,109.183 133.949,108.755 133.949,105.707 143.067,96.589 159.823,96.589 159.961,96.451 167.916,96.451 167.928,96.463 177.347,96.463 178.69,95.12 178.69,89.413 177.61,88.333 176.72,88.333 175.75,89.303 174.73,89.303 P4.5@174.625,89.408
  Layer 2 w0.25: v2(114.577,122.768) 115.389,122.768 115.614,122.994 116.917,122.994 117.058,122.853 v2(117.126,122.853)
PP96: P4.8 U2.AJ29 | length 87.5
  Top Layer w0.25: v2(117.094,123.825) 117.094,123.757 117.348,123.503 117.348,123.444 120.186,120.606 121.965,120.606 122.269,120.302 123.932,120.302 134.399,109.835 134.399,108.077 145.437,97.039 160.009,97.039 160.135,96.913 177.533,96.913 179.14,95.306 179.14,89.226 178.562,88.649 178.562,88.265 P4.8@177.165,86.868
  Layer 2 w0.25: 114.625,124.206 114.625,123.59 114.771,123.444 116.713,123.444 v2(117.094,123.825)
PP97: P4.7 U2.AJ30 | length 96.9
  Top Layer w0.25: v2(117.06,124.796) 131.233,124.796 151.829,104.2 170.882,104.2 177.269,97.813 177.906,97.813 180.04,95.679 180.04,88.854 179.59,88.404 179.59,85.233 177.61,83.253 176.72,83.253 175.792,84.181 175.792,85.701 P4.7@174.625,86.868
  Layer 2 w0.25: v2(114.106,125.095) 115.602,125.095 115.722,124.975 116.813,124.975 116.992,124.796 v2(117.06,124.796)
PP100: P4.10 U2.AK30
PP119: P4.9 U2.AE30
PP128: P4.12 U2.AC26
PP130: P4.11 U2.AD26
PP131: P4.14 U2.AB25
PP132: P4.13 U2.AB26
PP133: P4.16 U2.AA27
PP134: P4.15 U2.AA28
PP137: P4.18 U2.Y28
PP138: P4.17 U2.AA29
PP139: P4.20 U2.Y26
PP140: P4.19 U2.Y27
PP141: P4.22 U2.AB29
PP143: P4.21 U2.AB30
PP144: P4.24 U2.Y30
PP146: P4.23 U2.AA30
PP147: P4.26 U2.AA25
PP148: P4.25 U2.Y25
RED0: R18.2 U2.AC13
RED1: R17.2 U2.AC14
RED2: R16.2 U2.AA14
RED3: R15.2 U2.AA15
RS: LCD1.4 U3.39
RS_N: C32.2 D4.1 J1.1 R38.2 R40.2 | length 24.8
  Top Layer w0.25: D4.1@148.192,111.512 149.167,111.512 149.464,111.809 149.464,112.741 152.626,115.903 J1.1@170.674,115.903
RS_P: C33.2 D4.2 J1.6 R39.1 R41.2 | length 58.6
  Top Layer w0.25: D4.2@150.495,111.512 150.495,110.912 150.97,110.437 151.61,110.437 152.06,109.987 160.869,109.987 164.696,113.815 ; D4.2@150.495,118.142 150.145,118.142 148.92,116.917 148.92,114.503 147.066,112.649 147.066,110.236 147.447,109.855 161.417,109.855 164.933,113.371 164.933,113.578 164.696,113.815 ; J1.6@173.761,117.303 173.761,114.217 173.463,113.919 164.8,113.919 164.696,113.815
RW: LCD1.5 U3.38
RX2: U2.AC23 U5.1
RX_232: U2.AF19 U6.12
RXD0_PA9: U1.1 U3.42
RXD_FT2232/MIPSSE_TDI: U2.AG12 U9.39
SCL: R35.1 U3.58 U13.6
SDA: R36.1 U3.59 U13.5
SWCLK: P1.2 R21.1 U3.49
SWDIO: P1.1 R20.1 U3.46
TCK: P5.1 R32.2 U4.6 U9.16 | length 26.7
  Top Layer w0.25: U9.16@57.947,21.846 57.658,21.846 57.658,18.542 62.782,13.418 P5.1@78.646,13.418
TDI: P5.9 U4.4 U9.17 | length 35
  Top Layer w0.25: U9.17@59.722,20.071 59.722,19.012 59.922,18.812 59.922,18.675 60.976,17.621 61.249,17.621 64.587,14.283 77.401,14.283 77.761,14.643 79.531,14.643 80.111,14.062 80.111,12.822 80.741,12.193 82.167,12.193 82.617,11.743 84.358,11.743 84.808,12.193 87.731,12.193 88.806,13.268 P5.9@88.806,13.418
TDO: P5.3 U2.Y10 U9.18 | length 28.2
  Top Layer w0.25: U9.18@60.222,20.071 60.222,19.148 60.372,18.998 60.372,18.862 61.163,18.071 61.436,18.071 64.774,14.733 77.215,14.733 77.571,15.089 77.571,16.553 78.201,17.183 79.091,17.183 79.948,16.326 79.948,14.861 81.186,13.624 P5.3@81.186,13.418
TMS: P5.5 U4.5 U9.19 | length 27.3
  Top Layer w0.25: U9.19@60.722,20.071 60.722,19.284 60.822,19.184 60.822,19.048 61.349,18.521 80.293,18.521 82.261,16.553 82.261,15.033 83.726,13.568 P5.5@83.726,13.418
TX2: U2.AA22 U5.4
TX_232: U2.AG19 U6.11
TXD0_PA10: U1.5 U3.43
TXD_FT2232/MIPSSE_TCK: U2.AH12 U9.38
UB: U2.AK15 U7.40
UTOF: U2.AF24 U3.62
VSYNC: R10.1 U2.AJ19
WE: U2.AD15 U7.17 | length 110
  Top Layer w0.25: U7.17@70.485,60.414 70.452,60.447 69.627,60.447 61.098,68.976 61.098,76.212 77.133,92.248 79.088,92.248 80.568,93.727 84.551,93.727 85.057,93.222 96.055,93.222 116.409,93.222 118.073,94.886 118.073,95.522 119.46,96.909 119.46,102.529 119.186,102.803 119.186,103.022 119.061,103.147 119.061,104.206 118.482,104.785 v3(118.482,106.68)
  Layer 1 w0.25: v3(109.233,110.062) 109.709,109.586 109.709,109.379 109.661,109.331 109.661,108.855 109.998,108.518 110.377,108.518 111.362,107.533 111.362,107.509 112.878,105.993 113.409,105.993 113.689,105.713 114.911,105.713 115.191,105.993 116.413,105.993 116.656,106.236 118.038,106.236 v3(118.482,106.68)
pads on no net: D5.1 D6.1 D7.1 J1.2 J1.3 J1.4 J1.7 J1.8 J1.9 J1.10 J1.11 J2.1 J2.4 J2.5 J2.6 J2.7 J2.8 J2.9 J2.10 J2.11 LCD1.0 LCD1.7 LCD1.8 LCD1.9 LCD1.10 P5.6 P5.7 P5.8 R34.2 R49.2 R51.2 S8.2 U1.2 U1.3 U1.6 U1.8 U1.9 U1.10 U1.11 U1.12 U1.13 U1.14 U1.19 U1.24 U1.27 U1.28 U2.A2 U2.A3 U2.A4 U2.A5 U2.A6 U2.A7 U2.A8 U2.A9 U2.A10 U2.A12 U2.A13 U2.A14 U2.A15 U2.A16 U2.A17 U2.A18 U2.A19 U2.A20 U2.A22 U2.A23 U2.A24 U2.A25 U2.A26 U2.A27 U2.A28 U2.A29 U2.A30 U2.AA2 U2.AA3 U2.AA4 U2.AA6 U2.AA7 U2.AA8 U2.AA18 U2.AA19 U2.AA20 U2.AB1 U2.AB2 U2.AB4 U2.AB5 U2.AB6 U2.AB8 U2.AB9 U2.AB10 U2.AB19 U2.AB20 U2.AC2 U2.AC3 U2.AC4 U2.AC6 U2.AC7 U2.AC8 U2.AC10 U2.AC18 U2.AC19 U2.AC20 U2.AC22 U2.AD1 U2.AD2 U2.AD4 U2.AD5 U2.AD6 U2.AD8 U2.AD9 U2.AD10 U2.AD18 U2.AD19 U2.AD20 U2.AD21 U2.AD23 U2.AE2 U2.AE3 U2.AE4 U2.AE6 U2.AE7 U2.AE8 U2.AE10 U2.AE20 U2.AE22 U2.AF1 U2.AF2 U2.AF4 U2.AF5 U2.AF6 U2.AF8 U2.AF9 U2.AF10 U2.AF22 U2.AG2 U2.AG3 U2.AG4 U2.AG6 U2.AG7 U2.AG8 U2.AG10 U2.AH1 U2.AH2 U2.AH4 U2.AH5 U2.AH6 U2.AH8 U2.AH9 U2.AH10 U2.AJ2 U2.AJ3 U2.AJ4 U2.AJ6 U2.AJ7 U2.AJ8 U2.AJ10 U2.AK1 U2.AK2 U2.AK4 U2.AK5 U2.AK6 U2.AK8 U2.AK9 U2.AK10 U2.B1 U2.B2 U2.B3 U2.B4 U2.B5 U2.B6 U2.B7 U2.B9 U2.B10 U2.B11 U2.B12 U2.B13 U2.B14 U2.B15 U2.B16 U2.B17 U2.B19 U2.B20 U2.B21 U2.B22 U2.B23 U2.B24 U2.B25 U2.B26 U2.B27 U2.B29 U2.B30 U2.C1 U2.C2 U2.C3 U2.C4 U2.C6 U2.C7 U2.C8 U2.C9 U2.C10 U2.C11 U2.C12 U2.C13 U2.C14 U2.C16 U2.C17 U2.C18 U2.C19 U2.C20 U2.C21 U2.C22 U2.C23 U2.C24 U2.C26 U2.C27 U2.C28 U2.C29 U2.C30 U2.D1 U2.D3 U2.D4 U2.D5 U2.D6 U2.D7 U2.D8 U2.D9 U2.D10 U2.D11 U2.D13 U2.D14 U2.D15 U2.D16 U2.D17 U2.D18 U2.D19 U2.D20 U2.D21 U2.D23 U2.D24 U2.D25 U2.D26 U2.D27 U2.D28 U2.D29 U2.D30 U2.E1 U2.E2 U2.E3 U2.E4 U2.E5 U2.E6 U2.E7 U2.E8 U2.E10 U2.E11 U2.E12 U2.E13 U2.E14 U2.E15 U2.E16 U2.E17 U2.E18 U2.E20 U2.E21 U2.E22 U2.E23 U2.E24 U2.E25 U2.E26 U2.E27 U2.E28 U2.E30 U2.F1 U2.F2 U2.F3 U2.F4 U2.F5 U2.F7 U2.F8 U2.F9 U2.F10 U2.F11 U2.F12 U2.F13 U2.F14 U2.F15 U2.F17 U2.F18 U2.F19 U2.F20 U2.F21 U2.F22 U2.F23 U2.F24 U2.F25 U2.F27 U2.F28 U2.F29 U2.F30 U2.G1 U2.G2 U2.G4 U2.G5 U2.G6 U2.G7 U2.G8 U2.G9 U2.G10 U2.G11 U2.G12 U2.G14 U2.G15 U2.G16 U2.G17 U2.G18 U2.G19 U2.G20 U2.G21 U2.G22 U2.G24 U2.G25 U2.G26 U2.G27 U2.G28 U2.G29 U2.G30 U2.H1 U2.H2 U2.H3 U2.H4 U2.H5 U2.H6 U2.H7 U2.H8 U2.H9 U2.H11 U2.H12 U2.H13 U2.H14 U2.H15 U2.H16 U2.H17 U2.H18 U2.H19 U2.H21 U2.H22 U2.H23 U2.H24 U2.H25 U2.H26 U2.H27 U2.H28 U2.H29 U2.J1 U2.J2 U2.J3 U2.J4 U2.J5 U2.J6 U2.J8 U2.J9 U2.J10 U2.J11 U2.J12 U2.J13 U2.J14 U2.J15 U2.J16 U2.J18 U2.J19 U2.J20 U2.J21 U2.J22 U2.J23 U2.J24 U2.J25 U2.J26 U2.J28 U2.J29 U2.J30 U2.K1 U2.K2 U2.K3 U2.K5 U2.K6 U2.K7 U2.K8 U2.K9 U2.K10 U2.K11 U2.K12 U2.K13 U2.K15 U2.K16 U2.K17 U2.K18 U2.K19 U2.K20 U2.K21 U2.K22 U2.K23 U2.K25 U2.K26 U2.K27 U2.K28 U2.K29 U2.K30 U2.L1 U2.L2 U2.L3 U2.L4 U2.L5 U2.L6 U2.L7 U2.L8 U2.L9 U2.L10 U2.L12 U2.L13 U2.L14 U2.L15 U2.L16 U2.L17 U2.L18 U2.L19 U2.L20 U2.L22 U2.L23 U2.L24 U2.L25 U2.L26 U2.L27 U2.L28 U2.L29 U2.L30 U2.M10 U2.M12 U2.M16 U2.M17 U2.M19 U2.M20 U2.M21 U2.M22 U2.M23 U2.M24 U2.M25 U2.M26 U2.M27 U2.M29 U2.M30 U2.N2 U2.N3 U2.N4 U2.N6 U2.N7 U2.N8 U2.N18 U2.N21 U2.N22 U2.N23 U2.N24 U2.N26 U2.N27 U2.N28 U2.N29 U2.N30 U2.P1 U2.P2 U2.P4 U2.P5 U2.P6 U2.P8 U2.P14 U2.P15 U2.P21 U2.P23 U2.P24 U2.P25 U2.P26 U2.P27 U2.P28 U2.P29 U2.P30 U2.R2 U2.R3 U2.R4 U2.R6 U2.R7 U2.R8 U2.R21 U2.R22 U2.R23 U2.R24 U2.R25 U2.R26 U2.R27 U2.R28 U2.R30 U2.T1 U2.T2 U2.T4 U2.T5 U2.T6 U2.T7 U2.T21 U2.T22 U2.T23 U2.T24 U2.T25 U2.T27 U2.T28 U2.T29 U2.T30 U2.U2 U2.U3 U2.U4 U2.U6 U2.U7 U2.U8 U2.U14 U2.U15 U2.U21 U2.U22 U2.U24 U2.U25 U2.U26 U2.U27 U2.U28 U2.U29 U2.U30 U2.V1 U2.V2 U2.V4 U2.V5 U2.V6 U2.V7 U2.V21 U2.V22 U2.V23 U2.V24 U2.V25 U2.V26 U2.V27 U2.V28 U2.V29 U2.W2 U2.W3 U2.W4 U2.W6 U2.W7 U2.W8 U2.W24 U2.W25 U2.W26 U2.W28 U2.W29 U2.W30 U2.Y1 U2.Y2 U2.Y4 U2.Y5 U2.Y6 U2.Y8 U2.Y19 U2.Y20 U4.2 U4.9 U4.12 U4.13 U4.14 U4.15 U4.16 U6.7 U6.8 U6.9 U6.10 U7.28 U8.6 U9.21 U9.22 U9.23 U9.24 U9.26 U9.27 U9.28 U9.29 U9.30 U9.32 U9.33 U9.34 U9.36 U9.40 U9.41 U9.43 U9.44 U9.45 U9.46 U9.48 U9.52 U9.53 U9.54 U9.55 U9.57 U9.58 U9.59 U9.60 U11.6 U11.7 USB1.4 USB1.6 USB1.7 USB1.8 USB1.9 USB1.MH1 USB1.MH2 USB2.1 USB2.4 USB2.6 USB2.7 USB2.8 USB2.9 USB2.MH1 USB2.MH2 VGA1.4 VGA1.9 VGA1.12 VGA1.13 VGA1.14 VGA1.15 VGA1.16 VGA1.17 VR2.1 VR3.1 VR4.1
copper on no net: | length 0.1
  Bottom Layer w0.25: 69.342,94.234 69.342,94.198 69.411,94.129

## Text inside footprints (layer, text, board x,y; h text height)
P2: Top Overlay "2" at 39.243,177.705 h1.27; Top Overlay "1" at 39.751,175.165 h1.27; Top Overlay "17" at 64.643,175.165 h1.27; Top Overlay "18" at 64.643,177.705 h1.27
P3: Top Overlay "1" at 23.241,125.349 h1.27 r270; Top Overlay "2" at 25.781,125.349 h1.27 r270; Top Overlay "29" at 23.241,85.725 h1.27 r270; Top Overlay "30" at 25.781,85.725 h1.27 r270
P4: Top Overlay "1" at 174.117,97.028 h1.27 r270; Top Overlay "2" at 176.657,97.028 h1.27 r270; Top Overlay "29" at 174.117,57.404 h1.27 r270; Top Overlay "30" at 176.657,57.404 h1.27 r270
USB1: Mechanical 1 "PCB Edge" at 100.236,9.965 h0.25
USB2: Mechanical 1 "PCB Edge" at 117,9.965 h0.25